# Allegro board lay-90829-A.brd
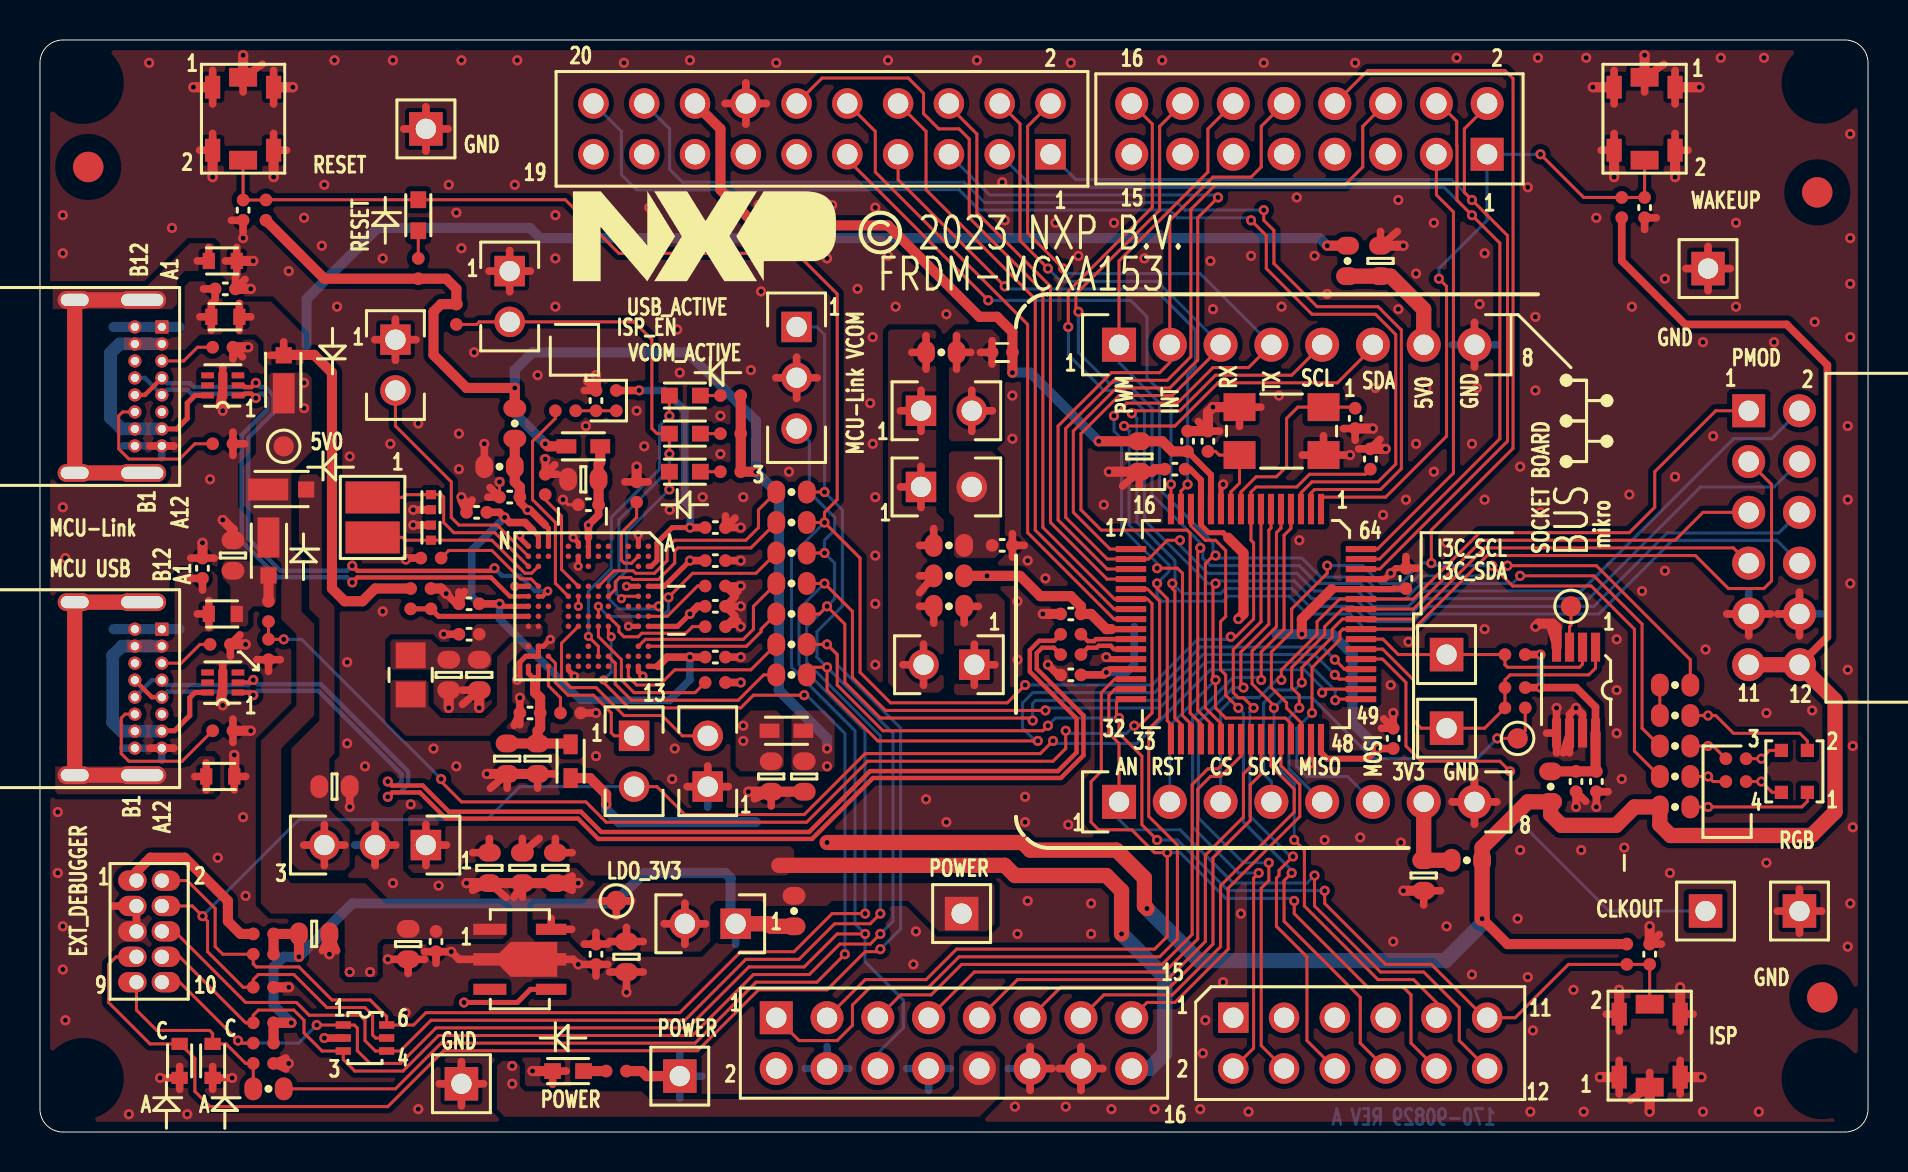
[diagram p0: board, top side]
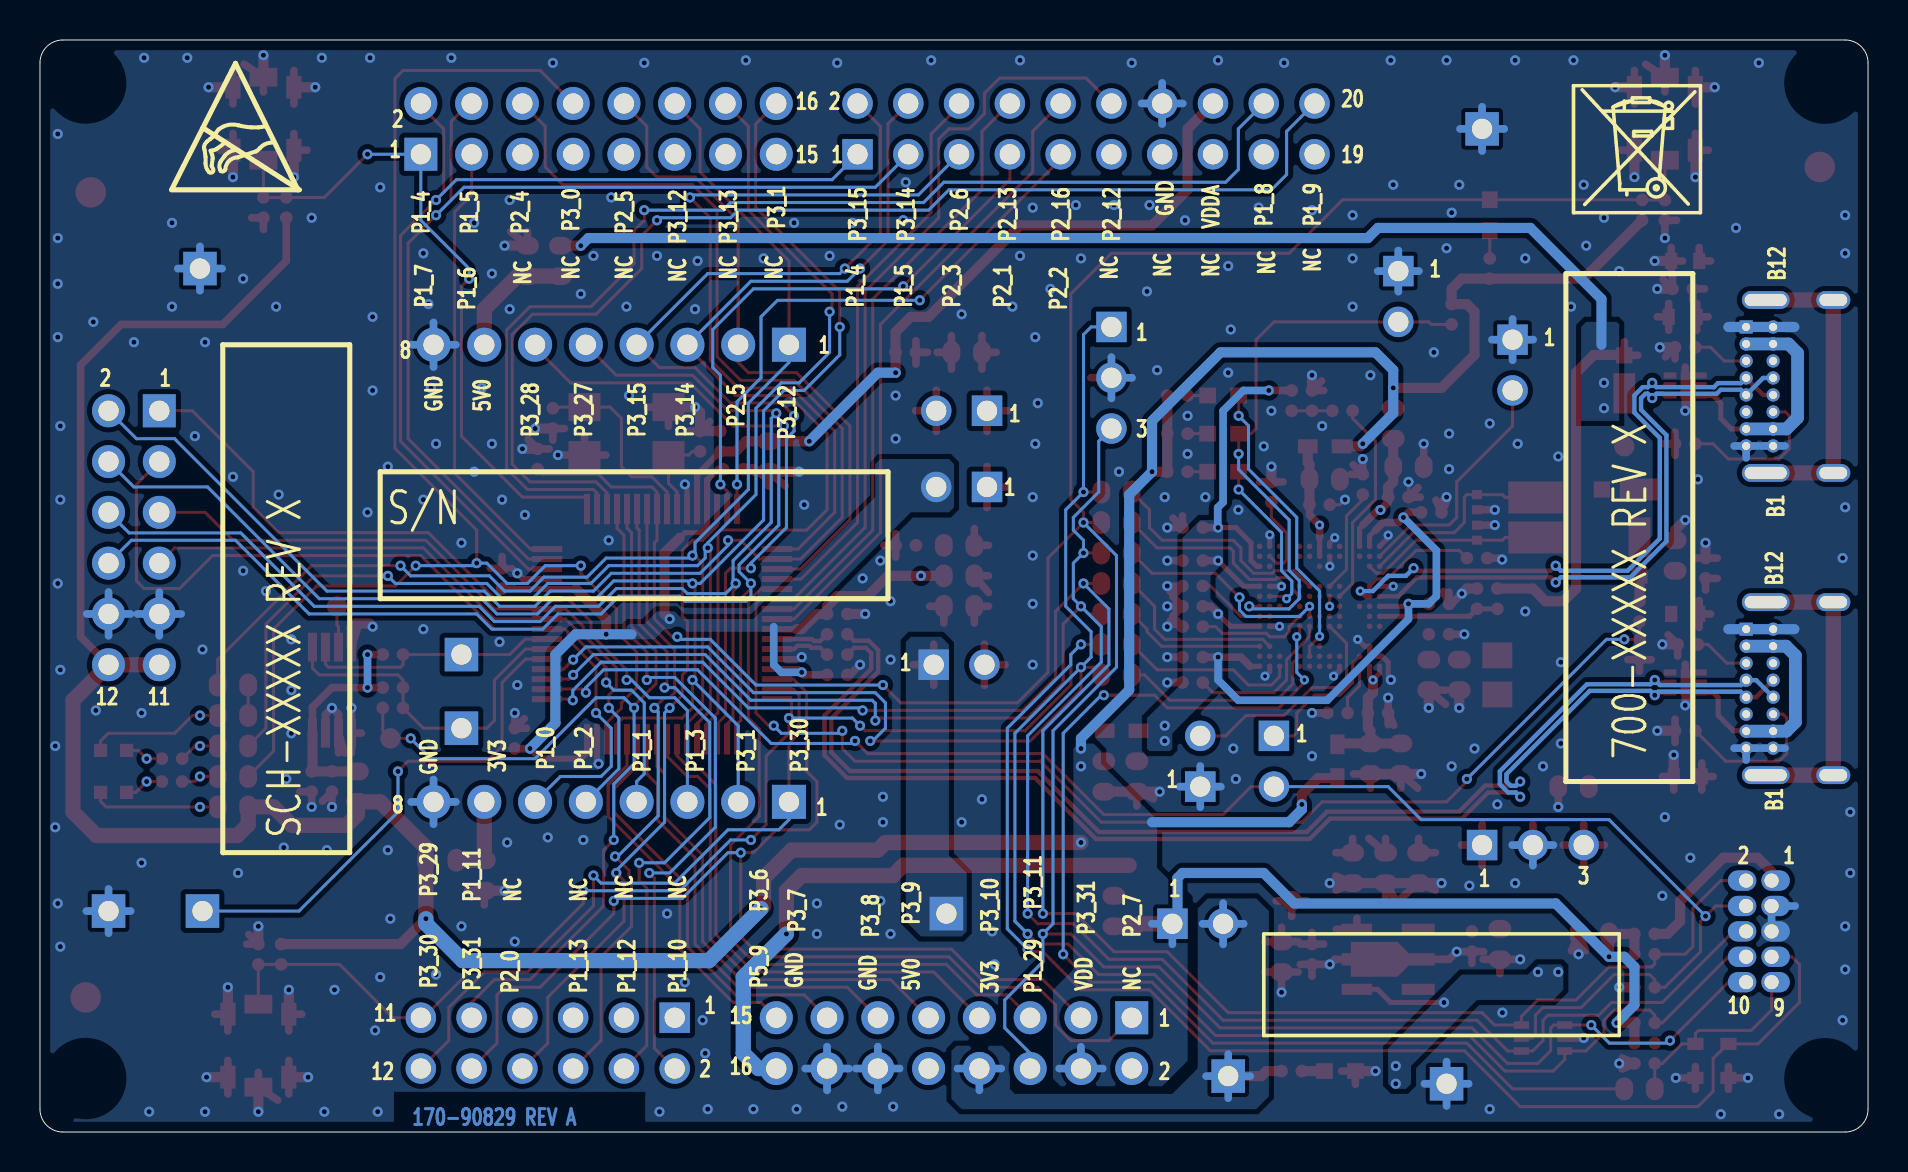
[diagram p1: board, bottom side, seen from below]

Outline 91.44 x 54.61 mm; copper layers: TOP, BOTTOM. Coordinates in mm from the lower left corner of the outline.
Outline path: 0,53.47 0,1.14 arc(0.33,0.33) 1.14,0 90.3,0 arc(91.11,0.33) 91.44,1.14 91.44,53.47 arc(91.11,54.28) 90.3,54.61 1.14,54.61 arc(0.33,54.28) 0,53.47

## Design rules (mm)
constraint set DEFAULT: min track width 0.152
net group DIFFPAIR3: nets USB0_DM USB0_DP
net group DIFFPAIR4: nets FL_USB1_DM FL_USB1_DP
net group DIFFPAIR6: nets N1600387 N1600395

## Placement (name value [footprint] x y rotation side)
BH1  125  [MH125-160]  2.16 2.67 0 top
BH2  125  [MH125-160]  89.15 52.45 0 top
BH3  125  [MH125-160]  89.15 2.67 0 top
BH4  125  [MH125-160]  2.16 52.45 0 top
C1  0.1UF  [CC0402_25]  57.4 34.54 90 top
C2  1uF  [CC0402_25]  67.69 19.69 90 top
C3  0.1UF  [CC0402_25]  51.56 22.86 180 top
C4  0.1UF  [CC0402_25]  68.33 27.69 90 top
C5  0.1UF  [CC0402_25]  56.77 33.15 180 top
C6  0.1UF  [CC0402_25]  48.13 29.34 0 top
C7  0.1UF  [CC0402_25]  51.56 25.91 180 top
C10  0.1UF  [CC0402_25]  27.81 8.89 270 top
C11  10uF  [CC0603_OV]  29.34 8.76 270 top
C12  4.7uF  [CC0603_OV]  18.41 9.4 270 top
C13  0.1UF  [CC0402_25]  19.81 9.52 270 top
C14  4.7uF  [CC0603_OV]  9.65 28.83 90 top
C15  10uF  [CC0603_OV]  38.23 17.78 270 top
C17  0.1UF  [CC0402_25]  21.84 30.99 180 top
C18  0.1UF  [CC0402_25]  33.78 30.23 0 top
C19  0.1UF  [CC0402_25]  33.78 23.75 0 top
C20  0.1UF  [CC0402_25]  33.78 28.58 0 top
C24  10uF  [CC0603_OV]  36.58 17.78 270 top
C26  0.1UF  [CC0402_25]  27.81 36.58 90 top
C27  0.1UF  [CC0402_25]  27.43 31.37 180 top
C28  47pF  [CC0603_OV]  27.18 32.64 180 top
C31  47pF  [CC0603_OV]  21.97 22.86 270 top
C32  0.1UF  [CC0402_25]  21.46 24.89 180 top
C33  22uF  [CC0603_OV]  20.45 22.86 270 top
C34  22uF  [CC0603_OV]  24.89 18.67 270 top
C35  0.1UF  [CC0402_25]  24.51 20.95 180 top
C36  47pF  [CC0603_OV]  23.37 18.67 270 top
C37  12pF  [0402_CC]  19.56 29.97 90 top
C38  12pF  [0402_CC]  19.56 31.5 270 top
C39  0.1UF  [CC0402_25]  21.46 26.42 180 top
C40  0.1UF  [CC0402_25]  33.78 26.29 0 top
C41  2.2UF  [CC0402_25]  9.27 42.16 0 top
C42  0.1UF  [CC0402_25]  23.49 31.75 180 top
C48  10uF  [CC0603_OV]  13.72 9.91 0 top
C49  18pF  [CC0402_25]  65.79 35.69 270 top
C50  1000pF  [CC0402_25]  10.16 46.1 270 top
C51  0.1UF  [CC0402_25]  66.55 33.66 90 top
C52  1000pF  [CC0402_25]  80.52 8.89 90 top
C53  18pF  [CC0402_25]  58.42 34.54 90 top
C54  1000pF  [CC0402_25]  80.26 46.23 270 top
C55  1uF  [CC0402_25]  77.85 17.53 270 top
C56  0.1UF  [CC0402_25]  76.84 17.53 270 top
C57  10uF  [CC0603_OV]  22.48 13.21 270 top
C58  10uF  [CC0603_OV]  24.13 13.21 270 top
C59  10uF  [CC0603_OV]  25.78 13.21 270 top
C60  10uF  [CC0603_OV]  14.73 17.27 0 top
C61  10uF  [CC0603_OV]  54.99 33.78 270 top
C62  10uF  [CC0603_OV]  69.22 12.83 270 top
C63  10uF  [CC0603_OV]  67.06 43.56 90 top
C64  2.2UF  [CC0402_25]  8.13 28.19 90 top
D1  MSS1P3L  [SMB_2P7X1P4]  11.43 29.08 270 top
D2  MSS1P3L  [SMB_2P7X1P4]  12.19 37.59 90 top
D3  MSS1P3L  [SMB_2P7X1P4]  12.07 32.13 0 top
D4  GREEN  [LED_0603]  26.42 3.05 180 top
D5  GREEN  [LED_0603]  32.26 36.83 180 top
D7  RED  [LED_0603]  32.26 34.93 180 top
D8  GREEN  [LED_0603]  32.26 33.02 180 top
D11  PESD3V3S1UB  [SOD523]  8.64 3.56 270 top
D12  PESD3V3S1UB  [SOD523]  6.98 3.56 270 top
D13  PESD3V3L5UY  [SOT-363_0P65_SMT]  16.26 4.7 0 top
D14  RED  [LED_0603]  18.92 45.85 90 top
D15  RGB  [LED4_2P7X2P6_SM]  87.76 18.03 90 top
J1  CON 2x8 SKT  [CON2X8_2P54_TH]  72.39 48.9 270 top
J2  HDR 2X10 TH  [HDR_2X10_2P54MM_TH]  50.55 48.9 270 top
J3  CON 2x8 SKT  [CON2X8_2P54_TH]  36.83 5.71 90 top
J4  CON 2X6  [CON_SKT2X6_100_TH]  59.69 5.71 90 top
J5  CON SKT 8  [CON_1X8_SKT_2P54_TH]  53.98 39.37 90 top
J6  CON SKT 8  [CON_1X8_SKT_2P54_TH]  53.98 16.51 90 top
J7  PPPC062LJBN-RC  [SKT2X6_100_TH_RA]  85.47 36.07 0 top
J8  USB_TYPE_C  [CON16_USB_TYPE-C_RA_TH]  6.1 25.15 270 top
J9  HDR 1X1  [HDR101]  19.3 50.16 0 top
J10  HDR 1X1  [HDR101]  88.01 11.05 0 top
J11  HDR 1X1  [HDR101]  83.44 43.18 0 top
J12  HDR 1X1  [HDR101]  21.08 2.41 270 top
J13  HDR 1X1  [HDR101]  46.1 10.92 90 top
J14  HDR 1X1  [HDR101]  32 2.79 0 top
J15  USB_TYPE_C  [CON16_USB_TYPE-C_RA_TH]  6.1 40.26 270 top
J18  HDR 2X5  [HDR_5X2_FTSH_TH]  4.83 12.57 0 top
J19  HDR 1X1  [HDR101]  83.31 11.05 180 top
J20  HDR 1X1  [HDR101]  70.36 20.19 0 top
J21  HDR 1X1  [HDR101]  70.36 23.88 0 top
J22  HDR_1X3  [HDR103]  19.3 14.35 270 top
J25  HDR_1X3  [HDR103]  37.85 40.26 0 top
JP1  HDR 1X2  [HDR102_95L]  44.07 36.07 90 top
JP2  HDR 1X2  [HDR102_95L]  44.07 32.26 90 top
JP3  HDR 1X2  [HDR102_95L]  46.74 23.37 270 top
JP6  HDR 1X2  [HDR102_95L]  34.8 10.41 270 top
JP8  HDR 1X2  [HDR102_95L]  23.49 43.05 0 top
JP10  HDR 1X2  [HDR102_95L]  29.72 19.81 0 top
JP19  HDR 1X2  [HDR102_95L]  33.4 17.27 180 top
JP20  HDR 1X2  [HDR102_95L]  17.78 39.62 0 top
L1  120 Ohm  [IND_0402]  48.13 38.99 180 top
L2  330 OHM  [IND_1608]  9.14 25.91 0 top
L3  330 OHM  [IND_1608]  9.02 17.78 0 top
L4  600OHM  [IND_1P8X1MM_SM]  37.34 20.07 180 top
L5  600OHM  [IND_1P8X1MM_SM]  27.18 34.29 0 top
L6  4.7uH  [IND_0805]  18.54 22.86 90 top
L7  600OHM  [IND_1P8X1MM_SM]  26.54 18.54 90 top
L8  330 OHM  [IND_1608]  9.27 40.77 0 top
L9  330 OHM  [IND_1608]  9.14 43.56 0 top
NOREF  -  []  22.7 6.34 0 top
NOREF#2  -  [unnamed#2]  89.15 6.73 0 top
NOREF#3  -  []  1.74 17.85 0 top
NOREF#4  -  []  89.01 13.99 0 top
NOREF#5  -  []  35.21 7.02 0 top
NOREF#6  -  []  4.75 19.2 0 top
NOREF#7  -  []  88.01 23.37 0 top
NOREF#8  -  []  66.08 21.65 90 top
NOREF#9  -  []  78.99 5.89 90 top
NOREF#10  -  []  87.11 16.98 90 top
NOREF#11  -  []  22.7 6.34 90 top
NOREF#12  -  []  25.99 47.48 90 top
NOREF#13  -  []  1.18 1.03 0 top
NOREF#14  -  []  59.69 5.71 0 top
NOREF#15  -  []  4.75 34.31 0 top
NOREF#16  -  []  26.54 17.7 90 top
NOREF#17  -  []  0 50.36 0 top
NOREF#18  -  []  77.11 55.87 0 top
NOREF#19  -  []  89.51 21.67 0 top
NOREF#20  -  []  26.28 33.79 90 top
NOREF#21  -  []  57.99 7.09 0 top
NOREF#22  -  []  6.49 26.75 90 top
NOREF#23  -  []  36.49 20.07 0 top
NOREF#24  -  []  42.04 44.96 0 top
NOREF#25  -  []  1.74 17.85 90 top
NOREF#26  -  []  26.04 16.64 90 top
NOREF#27  -  []  36.83 5.71 0 top
NOREF#28  -  []  6.49 41.86 90 top
NOREF#29  -  []  82.04 2.74 90 top
NOREF#30  -  []  6.1 39.41 90 top
NOREF#31  -  []  74.47 2.02 90 top
NOREF#32  -  []  54.61 48.9 90 top
NOREF#33  -  [unnamed#2]  2.41 48.26 0 top
NOREF#34  -  []  8.63 49.1 90 top
NOREF#35  -  []  77.11 52.97 90 top
NOREF#36  -  []  56.23 1.87 90 top
NOREF#37  -  []  74.09 1.8 90 top
NOREF#38  -  []  85.47 23.37 0 top
NOREF#39  -  []  1.74 32.96 90 top
NOREF#40  -  []  52.99 47.59 0 top
NOREF#41  -  []  25.99 47.48 0 top
NOREF#42  -  []  87.99 0 90 top
NOREF#43  -  []  22.5 7.13 0 top
NOREF#44  -  []  98.21 21.67 90 top
NOREF#45  -  []  30.23 4.83 0 top
NOREF#46  -  []  85.47 33.53 90 top
NOREF#47  -  [unnamed#2]  88.9 46.99 0 top
NOREF#48  -  []  1.74 32.96 0 top
NOREF#49  -  []  89.01 13.99 90 top
NOREF#50  -  []  74.47 4.92 0 top
NOREF#51  -  []  26.28 34.79 0 top
NOREF#52  -  []  72.39 3.17 90 top
NOREF#53  -  []  87.11 19.08 0 top
NOREF#54  -  []  26.04 17.64 0 top
NOREF#55  -  []  10.16 48.6 90 top
NOREF#56  -  []  27.69 48.9 90 top
NOREF#57  -  []  54.61 48.9 0 top
NOREF#58  -  []  38.24 17.76 90 top
NOREF#59  -  []  59.69 5.71 0 top
NOREF#60  -  []  80.26 48.6 90 top
NOREF#61  -  []  -12.34 -178.97 0 top
NOREF#62  -  []  52.99 47.59 90 top
NOREF#63  -  []  10.16 48.6 90 top
NOREF#64  -  []  26.67 42.55 0 top
NOREF#65  -  []  6.1 24.3 90 top
NOREF#66  -  []  78.74 49.1 90 top
NOREF#67  -  []  -272.82 262.61 0 top
NOREF#68  -  []  54.61 3.17 90 top
NOREF#69  -  []  27.69 48.9 0 top
NOREF#70  -  []  7.01 55.87 0 top
NOREF#71  -  []  37.24 19.57 0 top
NOREF#72  -  []  87.35 -34.82 0 top
NOREF#73  -  []  -2.66 26.75 0 top
NOREF#74  -  []  80.52 2.24 90 top
NOREF#75  -  []  22.5 10.14 0 top
NOREF#76  -  []  26.33 34.29 0 top
NOREF#77  -  []  80.26 48.6 90 top
NOREF#78  -  []  -297.46 -258.98 0 top
NOREF#79  -  []  7.01 52.97 90 top
NOREF#80  -  []  -2.66 41.86 0 top
NOREF#81  -  []  30.23 4.83 180 bottom
NOREF#82  -  []  75.95 13.97 90 bottom
NOREF#83  -  []  8.76 17.53 90 bottom
NOREF#84  -  []  74.42 26.67 180 bottom
NOREF#85  -  []  14.73 45.97 180 bottom
NOREF#86  -  []  84.84 47.12 180 bottom
R1  0  [RC0603_OV]  45.47 29.34 0 top
R2  2.7  [RC0603_OV]  45.47 26.29 180 top
R3  0  [RC0603_OV]  81.79 17.78 0 top
R4  0  [RC0603_OV]  81.79 22.35 180 top
R5  0  [RC0603_OV]  81.79 19.3 0 top
R7  33  [RC0402_25]  51.56 24.89 0 top
R8  33  [RC0402_25]  51.56 23.88 0 top
R9  10K  [RC0402_25]  11.43 26.03 270 top
R10  20K  [RC0402_25]  11.43 24.13 270 top
R12  470  [RC0402_25]  28.83 3.05 180 top
R13  10K  [RC0402_25]  28.83 36.58 270 top
R14  100  [RC0402_25]  26.29 36.07 180 top
R15  510  [RC0402_25]  34.54 36.83 180 top
R17  510  [RC0402_25]  34.54 34.93 180 top
R19  510  [RC0402_25]  34.54 33.02 180 top
R24  10K  [RC0402_25]  18.54 26.67 270 top
R26  20K  [RC0402_25]  19.56 26.67 90 top
R30  2.0K  [RC0603_OV]  23.75 35.43 270 top
R31  2.0K  [RC0603_OV]  22.99 33.27 180 top
R32  100K  [RC0402_25]  20.83 40.89 270 top
R35  1K  [RC0402_25]  26.54 20.95 0 top
R36  1K  [RC0402_25]  33.78 25.27 0 top
R37  1K  [RC0402_25]  33.78 27.3 0 top
R44  100  [RC0402_25]  11.18 9.91 180 top
R45  100K  [RC0402_25]  11.18 8.89 180 top
R46  100K  [RC0402_25]  11.18 5.46 180 top
R47  100K  [RC0402_25]  11.18 4.45 180 top
R48  2.0K  [RC0603_OV]  11.43 2.16 180 top
R49  100K  [RC0402_25]  11.18 7.24 0 top
R50  2.2K  [RC0402_25]  11.18 3.43 0 top
R51  10K  [RC0402_25]  11.3 46.1 90 top
R52  10K  [RC0402_25]  79.38 8.89 270 top
R53  470  [RC0402_25]  18.92 43.18 90 top
R55  10K  [RC0402_25]  79.12 46.23 90 top
R56  0  [RC0603_OV]  75.57 17.27 90 top
R57  680  [RC0603_OV]  81.79 20.83 180 top
R58  0  [RC0603_OV]  81.79 16.26 0 top
R59  1K  [RC0402_25]  73.79 21.21 180 top
R60  470  [RC0402_25]  84.84 18.67 180 top
R61  2.2K  [RC0402_25]  73.79 23.88 180 top
R62  2.2K  [RC0402_25]  73.79 22.23 180 top
R63  470  [RC0402_25]  84.84 17.53 180 top
R64  0  [RC0603_OV]  71.37 13.59 180 top
R65  0  [RC0603_OV]  65.41 43.56 270 top
R66  0  [RC0603_OV]  45.09 38.99 0 top
R67  0  [RC0603_OV]  45.47 27.81 0 top
R68  0  [RC0603_OV]  37.72 11.05 270 top
R69  0  [RC0603_OV]  37.59 27.43 180 top
R70  0  [RC0603_OV]  37.59 30.48 180 top
R71  0  [RC0603_OV]  37.59 28.96 180 top
R72  0  [RC0603_OV]  37.59 24.38 180 top
R73  0  [RC0603_OV]  37.59 32 180 top
R74  220  [RC0603_OV]  37.59 25.91 0 top
R75  0  [RC0603_OV]  37.59 22.86 0 top
R117  1K  [RC0402_25]  29.84 32 90 top
R118  1K  [RC0402_25]  19.56 28.7 180 top
R119  1K  [RC0402_25]  25.27 32.38 90 top
R120  1K  [RC0402_25]  33.78 22.48 0 top
R121  5.1K  [RC0402_25]  9.02 24.38 0 top
R122  5.1K  [RC0402_25]  9.14 20.07 0 top
R123  5.1K  [RC0402_25]  9.14 39.24 0 top
R124  5.1K  [RC0402_25]  9.14 34.42 0 top
SW1  PTS820 J15M SMTR LFS  [SW6_4P15_4P6X2P9]  10.16 50.67 270 top
SW2  PTS820 J15M SMTR LFS  [SW6_4P15_4P6X2P9]  80.52 4.32 90 top
SW3  PTS820 J15M SMTR LFS  [SW6_4P15_4P6X2P9]  80.26 50.67 270 top
TP1  -  [TPAD_040]  12.19 34.29 0 top
TP2  -  [TPAD_040]  28.83 11.56 0 top
TP5  -  [TPAD_040]  73.91 19.69 90 top
TP6  -  [TPAD_040]  76.58 26.29 270 top
U2  XC6227C331PR-G  [SOT89-5]  24 8.64 270 top
U3  RClamp0854P.TCT  [SLP1616P6]  9.14 22.48 90 top
U4  LPC55S69JEV98  [BGA98_0P5_7X7]  27.43 26.29 270 top
U6  RClamp0854P.TCT  [SLP1616P6]  9.14 37.34 90 top
U8  P3T1755DP  [TSSOP8_A]  76.84 22.1 270 top
U9  MCXA153VLH  [LQFP64]  60.32 25.4 270 top
Y1  8MHz  [XTAL4_5X3]  62.1 35.05 180 top
Y2  16MHz  [XTAL2_3P3X2P6]  16.64 30.73 270 top

## Library data of the parts
BH1-BH4 = MOUNT_HOLE
C1-C7 C10-C15 C17-C20 C24 C26-C28 C31-C42 C48-C64 = CAP_NP
D1-D3 = DIODE_SCHTKY
D4 D5 D7 D8 D14 = LED
D11 D12 = DIODE_TVS
D13 = DIODE_ARRAY_5CH
D15 = LRTBR48G_4P
J1 J3 = CONN_HDR_8X2
J2 = CONN_HDR_10X2
J4 J7 = CONN_HDR_6X2
J5 J6 = CONN_HDR_8X1
J8 J15 = USB16_TYPEC_4SH
J9-J14 J19-J21 = CONN_HDR_1X1
J18 = CONN_HDR_5X2
J22 J25 = CONN_HDR_3X1
JP1-JP3 JP6 JP8 JP10 JP19 JP20 = CONN_HDR_2X1
L1 = INDUCTOR_FERRITE
L2 L3 L8 L9 = BEAD
L4-L7 = INDUCTOR
R1-R5 R7-R10 R13-R15 R17 R19 R24 R26 R30-R32 R35-R37 R44-R52 R55-R59 R61 R62 R64-R75 R117-R124 = RES
R12 R53 R60 R63 = RES: tolerance: 1%
SW1-SW3 = PTS820J20MSMTRLFS_6P
TP1 TP2 TP5 TP6 = TestLoop
U2 = XC6227C_5P
U3 U6 = RCLAMP1654P_NEW
U4 = NIOBE4_MINI_FBGA98
U8 = P3T2175DP_TSSOP8
U9 = NIRVANA_MCXA10_LQFP64_A
Y1 = XTAL_13
Y2 = XTAL

## Footprints (pads in the part's own frame, mm; a bottom-side part is the same pattern mirrored in y, then rotated)
0402_CC
  rect 0.457x0.508 smd: 1(-0.376,0) 2(0.376,0)
BGA98_0P5_7X7
  round 0.279 smd: A1(-3,3) A2(-2.499,3) A3(-1.999,3) A5(-1.001,3) A6(-0.5,3) A7(0,3) A8(0.5,3) A9(1.001,3) A11(1.999,3) A12(2.499,3) A13(3,3) B1(-3,2.499) B2(-2.499,2.499) B3(-1.999,2.499) B5(-1.001,2.499) B6(-0.5,2.499) B7(0,2.499) B8(0.5,2.499) B9(1.001,2.499) B11(1.999,2.499) B12(2.499,2.499) B13(3,2.499) C1(-3,1.999) C2(-2.499,1.999) C7(0,1.999) C12(2.499,1.999) C13(3,1.999) E1(-3,1.001) E2(-2.499,1.001) E5(-1.001,1.001) E6(-0.5,1.001) E7(0,1.001) E8(0.5,1.001) E9(1.001,1.001) E12(2.499,1.001) E13(3,1.001) F1(-3,0.5) F2(-2.499,0.5) F5(-1.001,0.5) F6(-0.5,0.5) F8(0.5,0.5) F9(1.001,0.5) F12(2.499,0.5) F13(3,0.5) G1(-3,0) G2(-2.499,0) G3(-1.999,0) G5(-1.001,0) G6(-0.5,0) G8(0.5,0) G9(1.001,0) G11(1.999,0) G12(2.499,0) G13(3,0) H1(-3,-0.5) H2(-2.499,-0.5) H5(-1.001,-0.5) H6(-0.5,-0.5) H8(0.5,-0.5) H9(1.001,-0.5) H12(2.499,-0.5) H13(3,-0.5) J1(-3,-1.001) J2(-2.499,-1.001) J5(-1.001,-1.001) J6(-0.5,-1.001) J7(0,-1.001) J8(0.5,-1.001) J9(1.001,-1.001) J12(2.499,-1.001) J13(3,-1.001) L1(-3,-1.999) L2(-2.499,-1.999) L7(0,-1.999) L12(2.499,-1.999) L13(3,-1.999) M1(-3,-2.499) M2(-2.499,-2.499) M3(-1.999,-2.499) M5(-1.001,-2.499) M6(-0.5,-2.499) M7(0,-2.499) M8(0.5,-2.499) M9(1.001,-2.499) M11(1.999,-2.499) M12(2.499,-2.499) M13(3,-2.499) N1(-3,-3) N2(-2.499,-3) N3(-1.999,-3) N5(-1.001,-3) N6(-0.5,-3) N7(0,-3) N8(0.5,-3) N9(1.001,-3) N11(1.999,-3) N12(2.499,-3) N13(3,-3)
CC0402_25
  round 0.635 smd: 1(-0.508,0) 2(0.508,0)
CC0603_OV
  oval 0.889x1.143 smd: 1(-0.762,0) 2(0.762,0)
CON2X8_2P54_TH
  rect 1.651x1.651 hole 1.016: 1(0,0)
  round 1.651 hole 1.016: 2(-2.54,0) 3(0,-2.54) 4(-2.54,-2.54) 5(0,-5.08) 6(-2.54,-5.08) 7(0,-7.62) 8(-2.54,-7.62) 9(0,-10.16) 10(-2.54,-10.16) 11(0,-12.7) 12(-2.54,-12.7) 13(0,-15.24) 14(-2.54,-15.24) 15(0,-17.78) 16(-2.54,-17.78)
CON16_USB_TYPE-C_RA_TH
  rect 0.66x0.66 hole 0.406: A1(0,0)
  round 0.66 hole 0.406: A4(0.85,0) A5(1.7,0) A6(2.55,0) A7(3.4,0) A8(4.25,0) A9(5.1,0) A12(5.95,0) B1(5.95,-1.35) B4(5.1,-1.35) B5(4.25,-1.35) B6(3.4,-1.35) B7(2.55,-1.35) B8(1.7,-1.35) B9(0.85,-1.35) B12(0,-1.35)
  oval 0.889x2.388 hole 0.61x2.108: SH1(-1.35,-0.98) SH2(7.3,-0.98)
  oval 0.889x1.702 hole 0.61x1.397: SH3(-1.35,-4.36) SH4(7.3,-4.36)
CON_1X8_SKT_2P54_TH
  rect 1.702x1.702 hole 1.016: 1(0,0)
  round 1.702 hole 1.016: 2(0,-2.54) 3(0,-5.08) 4(0,-7.62) 5(0,-10.16) 6(0,-12.7) 7(0,-15.24) 8(0,-17.78)
CON_SKT2X6_100_TH
  rect 1.524x1.524 hole 1.016: 1(0,0)
  round 1.524 hole 1.016: 2(-2.54,0) 3(0,-2.54) 4(-2.54,-2.54) 5(0,-5.08) 6(-2.54,-5.08) 7(0,-7.62) 8(-2.54,-7.62) 9(0,-10.16) 10(-2.54,-10.16) 11(0,-12.7) 12(-2.54,-12.7)
HDR101
  rect 1.676x1.676 hole 1.016: 1(0,0)
HDR102_95L
  rect 1.524x1.524 hole 1.016: 1(0,0)
  round 1.524 hole 1.016: 2(0,-2.54)
HDR103
  rect 1.524x1.524 hole 1.016: 1(0,0)
  round 1.524 hole 1.016: 2(0,-2.54) 3(0,-5.08)
HDR_2X10_2P54MM_TH
  rect 1.524x1.524 hole 1.016: 1(0,0)
  round 1.524 hole 1.016: 2(-2.54,0) 3(0,-2.54) 4(-2.54,-2.54) 5(0,-5.08) 6(-2.54,-5.08) 7(0,-7.62) 8(-2.54,-7.62) 9(0,-10.16) 10(-2.54,-10.16) 11(0,-12.7) 12(-2.54,-12.7) 13(0,-15.24) 14(-2.54,-15.24) 15(0,-17.78) 16(-2.54,-17.78) 17(0,-20.32) 18(-2.54,-20.32) 19(0,-22.86) 20(-2.54,-22.86)
HDR_5X2_FTSH_TH
  oval 1.422x1.016 hole 0.711: 1(0,0) 2(1.27,0) 3(0,-1.27) 4(1.27,-1.27) 5(0,-2.54) 6(1.27,-2.54) 7(0,-3.81) 8(1.27,-3.81) 9(0,-5.08) 10(1.27,-5.08)
IND_1P8X1MM_SM
  rect 0.991x0.711 smd: 1(-0.846,0) 2(0.846,0)
IND_0402
  round 0.635 smd: 1(-0.508,0) 2(0.508,0)
IND_0805
  rect 1.295x1.499 smd: 1(-0.978,0) 2(0.978,0)
IND_1608
  rect 0.61x0.813 smd: 1(-0.701,0) 2(0.701,0)
LED4_2P7X2P6_SM
  rect 0.66x0.66 smd: 1(-1.049,-0.65) 2(1.049,-0.65) 3(1.049,0.65) 4(-1.049,0.65)
LED_0603
  rect 0.838x0.787 smd: A(-0.775,0) C(0.775,0)
LQFP64
  rect 1.524x0.305 smd: 1(-5.753,3.753) 2(-5.753,3.252) 3(-5.753,2.752) 4(-5.753,2.252) 5(-5.753,1.751) 6(-5.753,1.251) 7(-5.753,0.751) 8(-5.753,0.25) 9(-5.753,-0.25) 10(-5.753,-0.751) 11(-5.753,-1.251) 12(-5.753,-1.751) 13(-5.753,-2.252) 14(-5.753,-2.752) 15(-5.753,-3.252) 16(-5.753,-3.753) 33(5.753,-3.753) 34(5.753,-3.252) 35(5.753,-2.752) 36(5.753,-2.252) 37(5.753,-1.751) 38(5.753,-1.251) 39(5.753,-0.751) 40(5.753,-0.25) 41(5.753,0.25) 42(5.753,0.751) 43(5.753,1.251) 44(5.753,1.751) 45(5.753,2.252) 46(5.753,2.752) 47(5.753,3.252) 48(5.753,3.753)
  rect 0.305x1.524 smd: 17(-3.753,-5.753) 18(-3.252,-5.753) 19(-2.752,-5.753) 20(-2.252,-5.753) 21(-1.751,-5.753) 22(-1.251,-5.753) 23(-0.751,-5.753) 24(-0.25,-5.753) 25(0.25,-5.753) 26(0.751,-5.753) 27(1.251,-5.753) 28(1.751,-5.753) 29(2.252,-5.753) 30(2.752,-5.753) 31(3.252,-5.753) 32(3.753,-5.753) 49(3.753,5.753) 50(3.252,5.753) 51(2.752,5.753) 52(2.252,5.753) 53(1.751,5.753) 54(1.251,5.753) 55(0.751,5.753) 56(0.25,5.753) 57(-0.25,5.753) 58(-0.751,5.753) 59(-1.251,5.753) 60(-1.751,5.753) 61(-2.252,5.753) 62(-2.752,5.753) 63(-3.252,5.753) 64(-3.753,5.753)
MH125-160
  round 0 hole 3.175 unplated: (0,0)
RC0402_25
  round 0.635 smd: 1(-0.508,0) 2(0.508,0)
RC0603_OV
  oval 0.889x1.143 smd: 1(-0.762,0) 2(0.762,0)
SKT2X6_100_TH_RA
  rect 1.651x1.651 hole 1.016: 1(0,0)
  round 1.651 hole 1.016: 2(2.54,0) 3(0,-2.54) 4(2.54,-2.54) 5(0,-5.08) 6(2.54,-5.08) 7(0,-7.62) 8(2.54,-7.62) 9(0,-10.16) 10(2.54,-10.16) 11(0,-12.7) 12(2.54,-12.7)
SLP1616P6
  rect 0.305x0.635 smd: 1(-0.5,-0.759) 2(0,-0.759) 3(0.5,-0.759) 4(0.5,0.759) 5(0,0.759) 6(-0.5,0.759)
  rect 1.295x0.457 smd: 7(0,0)
SMB_2P7X1P4
  rect 0.813x0.813 smd: A(1.25,0)
  rect 2.007x1.092 smd: C(-0.65,0)
SOD523
  rect 0.61x0.813 smd: A(0.851,0) C(-0.851,0)
SOT89-5
  rect 0.559x1.651 smd: 1(-1.501,-1.501) 3(1.501,-1.501)
  custom 1.748x4.648 smd: 2(0,0)
  rect 0.559x1.524 smd: 4(1.501,1.565) 5(-1.501,1.565)
SOT-363_0P65_SMT
  rect 0.762x0.381 smd: 1(-1.085,0.65) 2(-1.085,0) 3(-1.085,-0.65) 4(1.085,-0.65) 5(1.085,0) 6(1.085,0.65)
SW6_4P15_4P6X2P9
  rect 0.94x1.397 smd: 1(-2.075,0) 2(2.075,0)
  rect 1.143x0.762 smd: 3(-1.575,1.525) 4(1.575,1.525) 5(-1.575,-1.525) 6(1.575,-1.525)
TPAD_040
  round 1.016 smd: 1(0,0)
TSSOP8_A
  rect 1.448x0.457 smd: 1(-2.149,0.975) 2(-2.149,0.325) 3(-2.149,-0.325) 4(-2.149,-0.975) 5(2.149,-0.975) 6(2.149,-0.325) 7(2.149,0.325) 8(2.149,0.975)
unnamed#2
  round 1.524 smd: (0,0)
XTAL2_3P3X2P6
  rect 1.6x2.718 smd: 1(-1.001,0) 2(1.001,0)
XTAL4_5X3
  rect 1.6x1.397 smd: 1(-2.101,-1.199) 2(2.101,-1.199) 3(2.101,1.199) 4(-2.101,1.199)

## Nets
GND: C1.2 C2.2 C3.2 C4.2 C5.2 C6.2 C7.2 C10.2 C11.2 C12.2 C13.2 C14.2 C15.2 C17.2 C18.2 C19.2 C20.2 C24.2 C26.2 C27.2 C28.2 C31.2 C32.2 C33.2 C34.2 C35.2 C36.2 C37.2 C38.2 C39.2 C40.2 C41.2 C42.2 C48.2 C49.2 C50.2 C51.2 C52.2 C53.2 C54.2 C55.2 C56.2 C57.2 C58.2 C59.2 C60.2 C61.2 C62.2 C63.2 C64.2 D4.C(CATHODE) D11.A D12.A D13.2 J2.14 J3.12 J3.14 J5.8 J6.8 J7.9 J7.10 J8.A1 J8.A12 J8.B1 J8.B12 J9.1 J10.1 J11.1 J12.1 J15.A1 J15.A12 J15.B1 J15.B12 J18.3 J18.5 J22.2 J25.2 JP8.1 JP19.1 JP20.1 L3.2 L9.2 R10.2 R26.2 R31.2 R35.2 R36.2 R37.2 R49.2 R50.2 R117.2 R118.2 R119.2 R120.2 R121.2 R122.2 R123.2 R124.2 SW1.1 SW1.3 SW1.4 SW1.5 SW1.6 SW2.1 SW2.3 SW2.4 SW2.5 SW2.6 SW3.1 SW3.3 SW3.4 SW3.5 SW3.6 U2.2(VSS) U3.7 U4.B1 U4.B5 U4.B9 U4.B13 U4.H1 U4.H2 U4.J13 U4.M11 U4.M12 U4.N1 U4.N5 U4.N12 U6.7 U8.4 U8.5 U8.6 U8.7 U9.11 U9.28 U9.47 U9.61(VSS4) Y1.2 Y1.4
P5V_HDR_IN: C60.1 D3.A J22.3
P5V_MCU_LINK_USB: D2.A L8.2 R24.1
P5V_USB_FS: C14.1 D1.A L2.2 R9.1
VBAT_DCDC/VBAT_PMU: C34.1 C35.1 C36.1 L7.2 U4.M13 U4.N13
VDD_BOARD: C15.1 C48.1 J3.4 J7.11 J7.12(B6) JP6.1 L4.1 L5.1 L7.1 R15.1 R17.1 R19.1 R30.1 R32.1 R44.1 R45.1 R46.1 R47.1 R51.1 R52.1 R53.1 R55.1 R56.1 R58.1 R64.1 R68.2
VDD_MCU: C2.1 C3.1 C4.1 C5.1 C6.1 JP2.2 R1.2 U9.13 U9.29 U9.48 U9.60
VDD_P3T: C55.1 C56.1 R56.2 R61.1 R62.1 U8.8(VCC)
VDD_USB: C7.1 R67.2 U9.25
VDDA_MCU: C1.1 C61.1 J2.16 L1.1 U9.12
DBGIF_DETECT: R48.1 U4.E9
DBGIF_ISP0_CTRL: R72.2 U4.C13
DBGIF_RESET: R70.2 U4.E6
DBGIF_TCK_SWCLK: JP10.1 U4.L12
DBGIF_TDI: R73.2 U4.F5
DBGIF_TDO_SWO: R71.2 U4.F8
DBGIF_TMS_SWDIO: R69.2 U4.B11
DBGIF_VREF: C42.1 R30.2 R31.1 U4.L1
FL_USB1_DM: J15.A7 J15.B7 U4.N6 U6.1
FL_USB1_DP: J15.A6 J15.B6 U4.M6 U6.2
HW_VER_0: R36.1 U4.E8
HW_VER_1: R37.1 U4.A8
HW_VER_2: R120.1 U4.F9
HW_VER_3: R117.1 U4.B2
HW_VER_4: R118.1 U4.M5
HW_VER_5: R119.1 U4.H5
HW_VER_6: JP19.2 U4.H9
HW_VER_7: JP20.2 U4.N2
HW_VER_8: R35.1 U4.L13
JTAG_VREF: J18.1 R44.2
LDO_3V3: C10.1 C11.1 J3.8 J13.1 J14.1 JP3.1 JP6.2 R2.1 R12.1 R68.1 TP2.1(PIN1) U2.5
LED_USB_COMM: D5.C(CATHODE) U4.F12
LED_VCOM_ACT: D8.C(CATHODE) U4.B6
MCU_LINK_3V3: C17.1 C18.1 C19.1 C20.1 C24.1 C39.1 C40.1 L4.2 R13.1 U4.A3 U4.A5 U4.A9 U4.A13 U4.M1 U4.N7
MCU_LINK_N_16MHZ: C37.1 U4.M3 Y2.2
MCU_LINK_P_16MHZ: C38.1 U4.N3 Y2.1
MCU_LINK_RST: R14.2 U4.J6
MCU_LNK_RX: R75.1 U4.E12
MCU_LNK_TX: R74.1 U4.A11
MCU_VDD_P3V3: JP1.1 JP2.1 JP3.2 R1.1 R2.2 R66.1 R67.1
P0_0/SWDIO: D13.6(K5) J18.2 R45.2 R69.1 U9.49
P0_1/SWCLK: D13.5 J18.4 JP10.2 R49.1 U9.50
P0_2: D13.4 J18.6 J25.3 R71.1 R74.2 U9.51
P0_3: D13.3 J18.8 J25.1 R46.2 R73.1 R75.2 U9.52
P0_6/CLKOUT: J19.1 U9.53
P0_16/I3C0_SDA-P3T: J20.1 R59.2 R62.2 U8.1 U9.54
P0_17/I3C0_SCL-P3T: J21.1 R61.2 U8.2 U9.55
P1_0: J6.6 J7.3 U9.56
P1_1: J6.4 J7.7 U9.57
P1_2: J6.5 J7.5 U9.58
P1_3: J6.3 J7.1 U9.59
P1_4: J1.2 J2.1 U9.62
P1_5: J1.4 J2.3 U9.63
P1_6/TRIG_IN2-MC_ENC_I: J1.3 U9.64
P1_7: C54.1 J1.1 R55.2 SW3.2 U9.1
P1_8/LPI2C0_SDA-ARD_D18: J2.18 U9.2
P1_9/LPI2C0_SCL-ARD_D19: J2.20 U9.3
P1_10/ADC0_A8-ARD_A0: J4.2 U9.4
P1_11: J4.9 R59.1 TP5.1(PIN1) U9.5
P1_12/ADC0_A10-ARD_A1: J4.4 U9.6
P1_13/ADC0_A11-ARD_A2: J4.6 U9.7
P1_29/MCU_RESET_B: C50.1 C51.1 D13.1 D14.C(CATHODE) J3.6 J18.10(B5) R47.2 R51.2 R70.1 SW1.2 U9.8
P1_30/XTAL48M: C49.1 U9.9 Y1.1
P1_31/EXTAL48M: C53.1 U9.10 Y1.3
P2_0/ADC0_A0-ARD_A3: J4.8 U9.14
P2_1/ADC0_A1-MC_VOLT_DCB: J2.7 U9.15
P2_2/ADC0_A4-MC_CURRENT_DCB: J2.9 U9.16
P2_3/ADC0_A2-MC_BEMF_C: J2.5 U9.17
P2_4: J1.6 J7.2 U9.18
P2_5: J1.10 J5.2 U9.19
P2_6/LPSPI1_PCS1-ARD_D10: J2.6 U9.20
P2_7/TRIG_IN5-MC_ENC_B: J3.1 U9.21
P2_12: J2.12 R9.2 R10.1 U9.22
P2_13/LPSPI1_SDO-ARD_D11: J2.8 U9.23
P2_16/LPSPI1_SDI-ARD_D12: J2.10 U9.24
P3_0: J1.8 R3.1 U9.46
P3_0/PWM0_A0-BLED: R3.2 R63.2
P3_1: J1.16(B8) J6.2 J7.4 U9.45
P3_6/PWM0_A0-MC_PWM_AT: J3.15 U9.44
P3_7/PWM0_B0-MC_PWM_AB: J3.13 U9.43
P3_8/PWM0_A1-MC_PWM_BT: J3.11 U9.42
P3_9/PWM0_B1-MC_PWM_BB: J3.9 U9.41
P3_10/PWM0_A2-MC_PWM_CT: J3.7 U9.40
P3_11/PWM0_B2-MC_PWM_CB: J3.5 U9.39
P3_12: J1.12 J5.1 R4.1 U9.38
P3_12/PWM0_X0-RLED: R4.2 R57.2
P3_13: J1.14 R5.1 U9.37
P3_13/PWM0_X1-GLED: R5.2 R60.2
P3_14: J2.4 J5.3 U9.36
P3_15: J2.2 J5.4 U9.35
P3_27: J5.5 J7.6 U9.34
P3_28: J5.6 J7.8 U9.33
P3_29: C52.1 D12.C J4.11 J18.7 R52.2 R72.1 SW2.2 U9.32
P3_30: J4.12(B6) J6.1 U9.31
P3_31: J3.3 J4.10 U9.30
P5-9V_VIN: C57.1 C58.1 C59.1 J3.16(B8) J22.1
PIO0_5-ISP_EN-LED_SWD_ACT: D7.C(CATHODE) JP8.2 R32.2 U4.A7
SYS_5V0: C12.1 C13.1 D1.C D2.C D3.C J3.10 R65.1 TP1.1(PIN1) U2.1 U2.4
USB0_DM: R7.2 U9.26
USB0_DP: R8.2 U9.27
VREF_MCULINK: C27.1 C28.1 L5.2 U4.G1 U4.G2
N84836: C26.1 R13.2 R14.1
N85250: D5.A R15.2
N85474: D7.A R17.2
N85648: C31.1 C32.1 C33.1 L6.2 U4.M9 U4.N9
N85680: D8.A R19.2
N85830: L6.1 U4.N11
N87448: R24.2 R26.1 U4.N8
N112823: D4.A R12.2
N301213: D11.C J18.9 R48.2 R50.1
N383974: D15.3 R60.1
N384008: D15.4(CATHODE3) R63.1
N384038: D15.2 R57.1
N479793: D15.1 R58.2
N629677: D14.A R53.2
N1221514: TP6.1(PIN1) U8.3
N1403888: JP1.2 L1.2 R66.2
N1410072: C62.1 J6.7 R64.2
N1410080: C63.1 J5.7 R65.2
N1590729: C41.1 J15.A4 J15.A9 J15.B4(VBUS4) J15.B9 L8.1 U6.6(VBUS)
N1590769: J15.A5 R123.1
N1590873: J15.B5 R124.1
N1591027: J15.SH1 J15.SH2 J15.SH3 J15.SH4 L9.1
N1600329: C64.1 J8.A4 J8.A9 J8.B4(VBUS4) J8.B9 L2.1 U3.6(VBUS)
N1600369: J8.A5 R121.1
N1600387: J8.A6 J8.B6 R8.1 U3.2
N1600395: J8.A7 J8.B7 R7.1 U3.1
N1600473: J8.B5 R122.1
N1600627: J8.SH1 J8.SH2 J8.SH3 J8.SH4 L3.1

Pads without a net: J1 5 7 9 11 13 15; J2 11 13 15 17 19; J3 2; J4 1 3 5 7; J8 A8 B8; J15 A8 B8; U2 3; U3 3 4 5; U4 A1 A2 A6 A12 B3 B7 B8 B12 C1 C2 C7 C12 E1 E2 E5 E7 E13 F1 F2 F6 F13 G3 G5 G6 G8 G9 G11 G12 G13 H6 H8 H12 H13 J1 J2 J5 J7 J8 J9 J12 L2 L7 M2 M7 M8; U6 3 4 5

## Via types
v1: diameter 0.457, hole 0.203, TOP to BOTTOM, 19 vias
v2: diameter 0.508, hole 0.254, TOP to BOTTOM, 450 vias

## Routing (per net, layer and track width the routed paths; a pad name or vN(x,y) marks a point on that pad's centre or on a via; arc(x,y) is an arc through that point)
GND: length 366.7
  TOP w0.152: C27.2 26.42,31.37 v2(26.16,31.62) ; v2(22.99,32.51) C42.2 ; R36.2 v2(35.05,25.27)
  TOP w0.254: v2(23.87,22.61) 24,22.75 24,23.49 24.3,23.79 U4.N12 U4.M12 U4.M11 25.18,24.29 v1(25.53,24.64) ; U4.H1 26.93,29.46 v1(26.67,29.72) ; U4.B1 29.93,29.86 v1(29.93,29.86) ; v1(26.92,28.29) 26.92,28.3 26.92,28.78 U4.H2 ; U4.J13 26.43,23.1 v1(26.73,22.8) ; U4.N1 24,29.72 v1(24,29.84) ; U9.11 59.07,31.15 59.07,32.28 v2(59.18,32.38) ; U4.B13 29.93,23.03 v1(30.16,22.8) ; v1(29.44,25.29) U4.B9 ; v1(29.34,27.29) U4.B5 ; U4.N5 v1(23.75,27.29)
  TOP w0.305: U9.28 53.44,23.65 v2(53.34,23.75) ; 68.33,28.19 67.82,28.19 v2(67.56,27.94) 67.27,27.65 U9.61 ; U9.47 63.58,19.65 63.58,18.49 v2(63.5,18.41)
  TOP w0.381: 36.58,16.31 C24.2 35.74,16.66 ; 19.98,2.41 J12.1 ; J12.1 21.08,1.31 ; J12.1 21.08,3.52 ; J12.1 22.19,2.41 ; R37.2 34.91,27.03 ; R37.2 v2(35.05,27.3) ; R37.2 34.77,26.83 ; 8.63,51.41 SW1.5 8.63,53.09 ; JP8.1 24.52,43.05 ; JP8.1 22.47,43.05 ; JP8.1 23.49,42.02 ; JP8.1 23.49,44.08 ; 65.2,35.18 C49.2 65.79,34.59 ; 82.33,43.18 J11.1 ; J11.1 83.44,44.29 ; J11.1 83.44,42.07 ; J11.1 84.54,43.18 ; 71.76,16.51 72.87,16.51 ; 71.76,16.51 71.76,17.63 ; 71.76,16.51 70.64,16.51 ; 71.76,16.51 71.76,15.39 ; 6.69,19.2 5.5,19.2 ; C10.2 28.4,8.38 ; C10.2 27.81,7.8 ; C10.2 v2(26.92,8.38) 26.67,8.64 U2.2 20.95,8.64 v2(20.57,9.02) C13.2 ; J22.2 17.79,14.35 ; J22.2 16.76,15.38 ; J22.2 16.76,13.32 ; 18.2,50.16 J9.1 ; J9.1 19.3,49.06 ; J9.1 19.3,51.27 ; J9.1 20.41,50.16 ; 36.82,37.72 J25.2 ; J25.2 37.85,38.75 ; J25.2 37.85,36.69 ; J25.2 38.88,37.72 ; 78.99,5.05 SW2.4 78.34,5.89 ; U3.7 v2(9.14,21.34) ; U3.7 9.14,23.39 ; U3.7 8.98,21.56 ; 34.28,51.44 J2.14 ; J2.14 36.34,51.44 ; J2.14 35.31,50.41 ; J2.14 35.31,52.46 ; 54.99,32.31 C61.2 54.15,32.31 ; 7.99,49.1 SW1.6 8.63,49.94 ; 78.74,53.09 SW3.5 78.74,51.41 ; 48.64,28.75 C6.2 ; C6.2 48.64,29.92 ; C6.2 49.23,29.34 ; 25.64,2.39 25.64,3.05 26.33,3.05 ; Y1.4 65.27,33.85 ; Y1.4 63.14,33.85 ; Y1.4 64.2,34.82 ; 34.77,25.75 R36.2 34.91,25.55 ; 10.16,45.01 C50.2 9.58,45.59 ; 11.13,53.4 SW1.1 10.16,52.01 ; v2(14.22,4.7) D13.2 ; L9.2 9.85,44.23 ; L9.2 9.85,42.89 ; L9.2 9.27,43.56 ; v2(18.67,30.35) 18.67,30.35 C37.2 ; C39.2 21.23,27.03 ; C39.2 20.83,26.42 v2(20.32,26.92) ; C39.2 20.95,27 ; C18.2 34.29,30.81 ; C18.2 v2(35.05,30.23) ; C18.2 34.77,30.7 ; C19.2 v2(35.05,23.75) ; JP20.1 18.81,39.62 ; JP20.1 17.78,40.65 ; JP20.1 17.78,38.59 ; JP20.1 16.75,39.62 ; 78.99,1.9 SW2.3 78.99,3.58 ; 75.36,19.95 U8.5 ; U8.5 75.86,18.96 ; U8.5 v2(75.86,21.21) ; 5.5,34.31 6.69,34.31 ; 82.69,5.89 SW2.6 82.04,5.05 ; 9.65,19.48 R122.2 9.65,20.65 ; 10.85,23.62 R10.2 ; R10.2 12.01,23.62 ; R10.2 11.43,23.04 ; 86.92,25.91 88.01,25.91 ; 88.01,25.91 88.01,24.82 ; 88.01,25.91 88.01,27 ; 51.05,22.86 50.93,22.86 v2(50.42,23.37) ; C12.2 19.25,8.64 ; C12.2 18.41,7.92 ; C12.2 v2(17.4,8.64) ; 30.43,32.51 R117.2 29.26,32.51 ; 6.98,2.13 D12.A ; D12.A v2(6.01,2.71) ; D12.A 6.98,3.28 ; 61.07,36.25 Y1.2 60,35.29 ; 9.72,17.11 L3.2 10.29,17.78 ; 70.05,12.06 C62.2 69.22,11.35 ; R119.2 25.75,33.37 ; R119.2 v2(25.27,33.66) ; R119.2 25.86,32.89 ; 77.85,16.43 C55.2 78.44,17.02 ; 78.09,49.1 SW3.6 78.74,49.94 ; v2(21.08,31.75) 21.34,31.5 C17.2 ; 24.13,11.73 C58.2 23.71,11.73 ; 7.54,28.7 C64.2 8.71,28.7 ; 21.64,12.09 C57.2 23.32,11.73 ; 22.51,32.23 C42.2 22.4,31.75 ; 24.89,17.2 C34.2 25.73,17.91 ; 67.21,20.67 C2.2 ; C2.2 v2(67.69,20.95) ; C2.2 67.11,20.19 ; 82.44,49.1 SW3.4 81.79,49.94 ; 49.53,2.08 49.53,3.17 ; 49.53,3.17 49.53,4.27 ; 49.53,3.17 50.62,3.17 ; 68.91,28.19 68.33,28.19 68.33,28.78 ; 9.65,38.66 R123.2 10.13,38.77 ; 81.79,53.09 SW3.3 81.79,51.41 ; 81.1,9.4 C52.2 81,9.88 ; 80.26,52.01 SW3.1 81.23,53.4 ; 19.81,8.43 C13.2 ; C13.2 19.23,9.02 ; 11.69,51.41 SW1.3 11.69,53.09 ; J10.1 88.01,12.15 ; J10.1 86.91,11.05 ; J10.1 89.12,11.05 ; J10.1 88.01,9.94 ; 9.65,33.83 R124.2 ; R124.2 9.65,35 ; R124.2 10.24,34.42 ; 80.85,45.72 C54.2 80.26,45.14 ; 23.37,17.2 C36.2 22.53,17.2 ; 59,35.05 C53.2 57.94,35.53 ; 21.06,31.6 C17.2 ; C17.2 21.61,31.6 ; D11.A 8.64,3.28 ; D11.A v2(9.61,2.71) ; D11.A 8.64,2.13 ; 21.13,22.1 C31.2 21.13,21.39 ; 28.5,8 C11.2 ; C11.2 v2(29.34,6.98) ; C11.2 30.18,8 ; C20.2 v2(35.05,28.58) ; C40.2 34.77,26.77 ; C40.2 34.77,25.81 ; C40.2 v2(35.05,26.29) ; 76.2,18.96 U8.6 ; U8.6 76.51,18.96 ; U8.6 76.51,20.88 v2(76.84,21.21) 77.16,20.88 U8.7 ; 9.78,42.75 C41.2 10.26,42.64 ; R50.2 12.3,3.71 ; R50.2 12.3,3.15 ; R50.2 v2(12.45,3.43) ; 82.04,3.58 SW2.5 82.04,1.9 ; v2(18.3,28.63) 18.38,28.7 R118.2 ; 85.47,25.91 86.56,25.91 ; 85.47,25.91 84.38,25.91 ; 85.47,25.91 85.47,24.82 ; 71.76,38.25 J5.8 71.76,40.49 ; 79.55,1.59 SW2.1 80.52,2.98 ; JP19.1 33.4,18.3 ; JP19.1 32.37,17.27 ; JP19.1 34.43,17.27 ; J3.14 52.07,4.27 ; J3.14 50.98,3.17 ; J3.14 52.07,2.08 ; J3.14 53.16,3.17 ; 4.83,10.53 J18.3 3.64,11.3 ; C32.2 v2(20.19,24.89) ; 67.03,34.64 C51.2 65.96,34.16 ; 67.89,45.03 C63.2 67.06,45.03 ; C35.2 v2(24,21.72) ; C35.2 23.73,20.34 ; C35.2 24,20.37 ; 27.34,37.56 C26.2 27.23,37.08 ; R120.2 v2(35.05,22.48) ; 10,24.86 R121.2 9.52,23.8 ; 26.62,12.8 C59.2 26.62,12.09 ; 14.12,9.07 C48.2 14.83,9.07 ; C60.2 v2(15.49,16.26) ; U6.7 v2(9.14,36.07) ; U6.7 8.98,36.42 ; U6.7 9.14,38.25 ; 77.31,16.54 C56.2 76.84,16.43 ; 11.69,49.94 SW1.4 12.33,49.1 ; R35.2 v2(27.81,20.95) ; 75.7,25.24 U8.4 75.55,25.24 ; R31.2 v2(22.22,34.42) ; v2(18.67,31.12) 18.67,31.12 C38.2
  TOP w0.508: R117.2 v2(29.84,33.27) ; L9.2 v2(10.67,43.56) ; SW3.6 v2(78.74,47.75) ; v2(9.14,30.61) 9.65,30.1 C14.2 ; SW1.5 v2(7.67,52.25) ; SW1.6 v2(8.63,47.75) ; R49.2 v2(12.45,7.24) ; C33.2 v2(20.45,21.21) ; C1.2 C53.2 58.42,36 v2(58.67,36.25) Y1.2 ; C15.2 C24.2 v2(35.43,17.02) ; v2(21.34,12.45) C57.2 C58.2 C59.2 v2(26.92,12.45) ; C52.2 v2(80.52,10.29) ; v2(53.47,33.02) C61.2 55.63,33.02 55.75,33.15 C5.2 ; SW2.5 v2(83.11,2.74) ; C34.2 C36.2 v2(22.35,17.91) ; C48.2 v2(14.48,8.89) ; 25.64,3.05 v2(24.64,3.05) ; v2(74.8,25.27) 74.95,25.42 75.67,25.42 75.86,25.23 U8.4 ; C63.2 v2(68.2,44.32) ; SW3.3 v2(83.01,52.25) ; R26.2 20.07,27.18 v2(20.32,26.92) ; SW3.5 v2(77.67,52.25) ; SW1.3 v2(12.65,52.25) ; C49.2 v2(66.68,35.18) ; R123.2 v2(10.41,39.24) ; C64.2 v2(8.13,29.46) ; C62.2 v2(68.2,12.06) ; SW2.6 v2(82.04,7.24) ; SW3.1 v2(80.26,53.85) ; C41.2 v2(10.54,42.16) ; R121.2 v2(10.29,24.38) ; SW2.4 v2(78.99,7.11) ; C31.2 v2(21.97,21.21) ; SW2.1 v2(80.52,1.02) ; C26.2 v2(27.81,37.85) ; SW1.1 v2(10.16,53.85) ; C51.2 v2(67.31,34.16) ; 51.05,25.91 v2(50.16,25.91) ; SW1.4 v2(11.69,47.75) ; SW2.3 v2(78.03,2.74) ; SW3.4 v2(81.79,47.75) ; L3.2 v2(9.72,18.86) ; R122.2 v2(10.54,20.07)
  BOTTOM w0.381: 88.01,25.91 88.01,27 ; 88.01,25.91 89.1,25.91 ; 88.01,25.91 88.01,24.82 ; 88.01,25.91 86.92,25.91 ; 6.1,33.71 6.1,34.31 ; 6.1,34.31 5.5,34.31 ; 6.1,34.31 6.69,34.31 ; 19.3,49.06 J9.1 ; J9.1 19.3,51.27 ; J9.1 20.41,50.16 ; J9.1 18.2,50.16 ; J12.1 22.19,2.41 ; J12.1 19.98,2.41 ; J12.1 21.08,1.31 ; J12.1 21.08,3.52 ; 88.01,9.94 J10.1 ; J10.1 88.01,12.15 ; J10.1 89.12,11.05 ; J10.1 86.91,11.05 ; 6.1,19.2 6.69,19.2 ; 6.1,19.2 5.5,19.2 ; 6.1,19.2 6.1,18.6 ; J3.14 52.07,4.27 ; J3.14 52.07,2.08 ; J3.14 50.98,3.17 ; J3.14 53.16,3.17 ; 82.33,43.18 J11.1 ; J11.1 83.44,44.29 ; J11.1 84.54,43.18 ; J11.1 83.44,42.07 ; 84.38,25.91 85.47,25.91 ; 85.47,25.91 85.47,24.82 ; 85.47,25.91 86.56,25.91 ; 85.47,25.91 85.47,27 ; 36.82,37.72 J25.2 ; J25.2 37.85,38.75 ; J25.2 37.85,36.69 ; 33.4,16.24 JP19.1 ; JP19.1 32.37,17.27 ; JP19.1 34.43,17.27 ; JP19.1 33.4,18.3 ; J2.14 35.31,52.46 ; J2.14 34.28,51.44 ; J2.14 35.31,50.41 ; J2.14 36.34,51.44 ; JP20.1 17.78,40.65 ; JP20.1 18.81,39.62 ; JP20.1 17.78,38.59 ; JP20.1 16.75,39.62 ; 4.15,34.31 J15.B1 5.34,34.31 ; 49.53,3.17 49.53,4.27 ; 49.53,3.17 49.53,2.08 ; 49.53,3.17 50.62,3.17 ; 49.53,3.17 48.44,3.17 ; 16.76,13.32 J22.2 ; J22.2 17.79,14.35 ; J22.2 15.73,14.35 ; 70.64,16.51 71.76,16.51 ; 71.76,16.51 71.76,17.63 ; 71.76,16.51 72.87,16.51 ; 71.76,16.51 71.76,15.39 ; 4.15,19.2 J8.B1 5.34,19.2 ; 70.64,39.37 J5.8 ; J5.8 71.76,38.25 ; J5.8 72.87,39.37 ; J5.8 71.76,40.49 ; 23.49,42.02 JP8.1 ; JP8.1 23.49,44.08 ; JP8.1 24.52,43.05 ; JP8.1 22.47,43.05 ; 3.64,11.3 J18.3 4.83,10.53
  BOTTOM w0.508: 6.98,25.15 J8.A1 J8.B12 3.68,25.15 ; 3.68,40.26 J15.B12 J15.A1 6.98,40.26
  vias: v2(0.89,16) v2(0.89,12.95) v2(1.14,45.85) v2(1.14,43.94) v2(1.14,31.24) v2(1.14,10.29) v2(1.14,8.13) v2(1.27,28.7) v2(1.27,5.59) v2(4.45,0.89) v2(5.46,53.47) v2(6.6,45.21) v2(7.37,0.89) v2(8.51,32.64) v2(8.89,13.72) v2(10.16,44.7) v2(10.16,15.75) v2(10.29,11.81) v2(12.45,43.05) v2(13.21,45.72) v2(14.1,44.32) v2(14.22,47.37) v2(14.73,53.59) v2(14.86,41.27) v2(15.37,23.49) v2(15.37,19.43) v2(15.49,33.78) v2(16.26,18.29) v2(17.14,43.69) v2(17.14,26.03) v2(17.53,34.42) v2(17.65,53.59) v2(17.65,12.45) v2(18.29,5.97) v2(18.54,16.38) v2(18.92,35.43) v2(18.92,1.14) v2(19.68,19.18) v2(19.94,12.32) v2(20.45,47.37) v2(20.83,45.97) v2(20.83,18.29) v2(20.95,34.93) v2(20.95,33.15) v2(21.08,53.59) v2(21.08,44.2) v2(21.72,38.99) v2(23.75,47.37) v2(23.88,53.59) v2(24.89,37.85) v2(25.78,45.85) v2(25.78,43.69) v2(25.78,41.27) v2(27.3,35.31) v2(27.81,46.1) v2(27.81,18.8) v2(29.21,53.47) v2(29.84,36.07) v2(30.23,34.29) v2(30.48,46.23) v2(31.5,31.12) v2(31.62,17.65) v2(31.75,19.18) v2(31.88,40.13) v2(32,43.31) v2(32,37.97) v2(32.51,53.59) v2(33.15,31.75) v2(34.04,35.81) v2(34.04,33.91) v2(34.16,45.59) v2(35.18,31.75) v2(35.56,38.1) v2(35.94,46.36) v2(36.07,42.04) v2(36.83,53.47) v2(37.46,33.02) v2(37.72,46.36) v2(39.37,43.69) v2(39.62,46.36) v2(40.89,42.16) v2(41.53,36.45) v2(41.66,39.75) v2(41.66,34.42) v2(41.78,46.23) v2(41.78,31.75) v2(41.78,28.83) v2(41.78,26.42) v2(41.78,23.37) v2(42.42,53.59) v2(42.42,43.82) v2(42.8,41.27) v2(43.69,8.38) v2(43.81,10.03) v2(44.32,16.64) v2(45.34,40.89) v2(45.34,15.49) v2(46.86,53.59) v2(48.13,47.5) v2(48.26,45.59) v2(48.64,36.83) v2(48.64,34.67) v2(48.77,1.27) v2(48.89,26.54) v2(48.89,23.62) v2(48.89,9.91) v2(49.28,16.76) v2(49.28,15.49) v2(49.4,28.58) v2(49.4,11.56) v2(50.29,27.69) v2(50.8,45.47) v2(51.31,1.27) v2(51.44,15.37) v2(51.56,53.47) v2(51.94,43.82) v2(52.58,11.43) v2(52.58,9.91) v2(53.21,31.37) v2(53.59,1.14) v2(53.72,45.47) v2(55.24,43.69) v2(55.75,1.14) v2(56.13,53.59) v2(58.04,1.14) v2(58.17,3.94) v2(58.29,5.59) v2(58.55,43.56) v2(58.67,41.15) v2(59.18,7.49) v2(60.07,10.92) v2(60.45,1.02) v2(60.58,43.82) v2(61.21,53.47) v2(61.98,36.83) v2(62.1,41.27) v2(62.87,46.74) v2(62.99,29.59) v2(63.75,43.82) v2(64.26,14.61) v2(64.39,41.91) v2(65.53,33.85) v2(65.79,53.47) v2(66.04,14.73) v2(66.8,37.21) v2(67.18,30.86) v2(67.56,22.35) v2(67.69,9.52) v2(67.95,46.61) v2(67.95,41.15) v2(68.07,14.48) v2(68.33,31.62) v2(68.45,24.51) v2(68.83,42.93) v2(68.83,34.42) v2(69.34,37.21) v2(69.72,45.47) v2(69.72,33.02) v2(70.36,29.46) v2(70.36,10.29) v2(70.87,53.72) v2(71.63,34.42) v2(71.63,7.87) v2(71.88,37.21) v2(72.01,41.4) v2(72.26,43.94) v2(72.26,31.62) v2(72.26,25.15) v2(73.91,10.67) v2(74.04,33.27) v2(74.04,14.1) v2(74.42,47.24) v2(74.42,7.75) v2(74.55,1.02) v2(74.68,5.08) v2(74.8,40.77) v2(74.8,37.08) v2(74.93,53.72) v2(75.06,30.99) v2(76.71,7.11) v2(76.84,16.26) v2(77.09,14.1) v2(77.22,1.02) v2(77.34,53.72) v2(77.85,45.72) v2(77.85,16.26) v2(78.87,24.64) v2(78.87,22.1) v2(78.87,19.94) v2(79.12,17.65) v2(79.25,14.22) v2(79.5,31.88) v2(79.63,41.27) v2(80.14,27.05) v2(81.28,42.67) v2(81.28,28.07) v2(81.53,12.95) v2(81.79,32.77) v2(83.19,39.5) v2(83.19,1.02) v2(83.31,24.13) v2(83.69,34.8) v2(84.07,53.72) v2(84.84,45.47) v2(84.84,41.27) v2(85.98,1.02) v2(86.23,53.72) v2(86.36,20.95) v2(86.36,13.46) v2(86.74,39.5) v2(88.65,21.08) v2(88.77,40.51) v2(90.42,35.31) v2(90.42,31.62) v2(90.42,23.11) v2(90.42,9.27) v2(90.55,49.91) v2(90.55,44.7) v2(90.55,42.42) v2(90.55,39.75) v2(90.55,27.43) v2(90.55,11.43) v2(90.68,19.3) v2(90.68,15.24)
P5V_HDR_IN: length 4.1
  TOP w0.381: J22.3 14.22,15.38 ; J22.3 14.22,13.32 ; J22.3 13.19,14.35 ; J22.3 15.25,14.35
P5V_MCU_LINK_USB: length 22
  TOP w0.381: L8.2 10.54,40.77 ; L8.2 9.97,40.09 ; L8.2 9.97,41.44 ; D2.A 12.87,38.84 ; D2.A 11.52,38.84 ; D2.A 12.19,39.52
  TOP w0.508: D2.A 12.21,38.86 13.72,38.86 14.61,37.97 14.61,27.18 15.24,26.54 16.13,26.54 16.76,27.18 R24.1
P5V_USB_FS: length 1.3
  TOP w0.508: D1.A R9.1
VBAT_DCDC/VBAT_PMU: length 8.1
  TOP w0.254: U4.N13 24.43,22.94 v1(24.77,22.61) 24.93,22.77 U4.M13
  TOP w0.508: v1(24.77,22.61) 24.77,21.97 25.02,21.72 C35.1 25.02,20.19 24.89,20.07 C34.1 ; C34.1 C36.1 ; C34.1 26.5,19.43 L7.2
VDD_BOARD: length 228
  TOP w0.381: R55.1 79.12,43.56 82.3,40.39 87.38,40.39 89.41,38.35 89.41,24.77 88.01,23.37
  TOP w0.508: L7.1 27.52,17.7 28.32,16.89 v2(28.32,16.38) ; R51.1 14.22,42.67 R53.1 20.32,42.67 20.83,42.16 R32.1 20.07,41.4 19.68,41.02 19.68,38.86 21.34,37.21 v2(23.75,37.21) R30.1 ; R15.1 R17.1 R19.1 v2(35.81,33.02) ; v2(72.14,10.67) 73.41,9.4 R52.1 ; R47.1 R46.1 v2(12.57,5.46) ; v2(12.95,8.76) C48.1 R44.1 R45.1 ; v2(25.27,34.42) 25.4,34.29 L5.1
  TOP w0.762: v2(72.14,10.67) R64.1 72.14,14.22 74.42,16.51 R56.1 75.57,15.88 76.11,15.33 78.83,15.33 79.76,16.26 R58.1 81.03,15.37 81.56,14.83 88.62,14.83 89.79,16 89.79,21.59 88.01,23.37 85.47,23.37 ; R68.2 36.58,10.29 36.45,10.41 JP6.1 ; v2(39.37,14.48) 49.15,14.48 49.53,14.1 53.85,14.1 55.24,12.7 55.24,11.3 v2(55.37,11.18)
  BOTTOM w0.381: 35.83,10.41 JP6.1 34.8,9.38 ; 38.28,3.17 J3.4 ; J3.4 39.37,4.27 ; J3.4 40.46,3.17
  BOTTOM w0.508: v2(28.32,16.38) 28.32,16.13 28.96,15.49 35.81,15.49 ; JP6.1 34.54,10.67 34.54,12.7 34.29,12.95 30.23,12.95 28.7,11.43 15.62,11.43 v2(12.95,8.76) 12.19,8.76 11.68,8.25 11.68,6.35 v2(12.57,5.46) ; v2(25.27,34.42) 23.75,35.94 v2(23.75,37.21) 23.75,38.1 24.64,38.99 32.38,38.99 35.81,35.56 v2(35.81,33.02) 36.96,31.88 36.96,22.1 39.37,19.69 v2(39.37,19.18)
  BOTTOM w0.762: v2(55.37,11.18) 57.98,8.57 70.29,8.57 72.14,10.41 v2(72.14,10.67)
  vias: v2(39.37,18.29)
VDD_MCU: length 36.1
  TOP w0.254: 59.44,29.72 59.18,29.97 58.46,29.97 58.07,30.35 58.07,31.15 U9.13
  TOP w0.305: C5.1 57.53,33.15 58.07,32.6 58.07,31.15 U9.13 ; v2(53.34,22.99) 53.5,23.15 U9.29 ; 64.62,27.15 66.08,27.15 U9.60 67.69,27.15 67.72,27.18 C4.1 ; v2(66.93,19.18) 66.42,18.67 64.38,18.67 64.08,18.97 64.08,19.65 U9.48
  TOP w0.381: v2(53.34,22.99) 53.21,22.86 C3.1 ; C2.1 v2(66.93,19.18)
  TOP w0.508: v2(63.12,24.89) 63.12,25.65 64.62,27.15 ; v2(59.94,25.65) 60.2,25.91 60.2,28.96 59.44,29.72
  BOTTOM w0.381: v2(53.34,22.99) 54.36,22.99 54.74,23.37 54.74,25.27
  BOTTOM w0.508: v2(66.93,19.18) 65.66,20.45 65.66,23.88 64.64,24.89 v2(63.12,24.89) 61.85,24.89
VDD_P3T: length 11.9
  TOP w0.381: R62.1 v2(75.06,22.23) 76.84,22.23 77.81,21.25 U8.8 ; R61.1 v2(75.06,23.88)
  TOP w0.508: R56.2 C56.1 C55.1 77.81,18.07 U8.8
  BOTTOM w0.381: v2(75.06,23.88) v2(75.06,22.23)
VDD_USB: length 9.7
  TOP w0.305: 53.59,25.15 U9.25
  TOP w0.508: 53.59,25.15 53.34,25.15 52.58,25.91 C7.1 52.07,26.29 51.56,26.8 50.04,26.8 49.02,27.81 v2(47.37,27.81) R67.2
VDDA_MCU: length 38.2
  TOP w0.305: U9.12 58.57,31.15 58.57,32.87 C1.1
  TOP w0.508: J2.16 34.04,50.16 34.04,47.12 35.81,45.34 42.42,45.34 46.99,40.77 47.88,40.77 48.64,40.01 L1.1 v2(48.64,37.97) ; C1.1 56.64,34.04 56.13,34.54 C61.1 v2(52.96,34.54)
  BOTTOM w0.508: v2(48.64,37.97) 49.53,37.97 v2(52.96,34.54)
DBGIF_DETECT: length 58.6
  TOP w0.152: U4.E9 28.43,24.91 v1(28.57,24.77) ; v2(38.23,21.84) 35.69,21.84 35.05,21.21 29.46,21.21 28.19,22.48 v1(28.19,22.61) ; v2(40.26,8.89) 38.86,7.49 35.82,7.49 32.77,4.45 20.07,4.45 17.78,2.16 12.19,2.16
  BOTTOM w0.152: v1(28.57,24.77) 28.57,22.99 v1(28.19,22.61) ; v2(40.26,8.89) 40.26,19.94 38.35,21.84 v2(38.23,21.84)
DBGIF_ISP0_CTRL: length 8.9
  TOP w0.152: U4.C13 29.43,22.77 29.84,22.35 30.99,22.35 31.75,23.11 35.56,23.11 R72.2
DBGIF_RESET: length 10.6
  TOP w0.152: R70.2 35.56,29.21 31.9,29.21 31.75,29.06 31.75,28.45 30.93,27.63 29.64,27.63 29.56,27.72 28.99,27.72 28.78,27.51 28.78,27.13 U4.E6
DBGIF_TCK_SWCLK: length 7.1
  TOP w0.152: U4.L12 25.78,23.44 25.78,22.48 26.42,21.84 27.69,21.84 28.57,20.95 28.57,19.96 28.73,19.81 JP10.1
DBGIF_TDI: length 11.8
  TOP w0.152: U4.F5 28.71,28.07 29.67,28.07 29.79,27.94 30.73,27.94 31.37,28.58 31.37,29.21 31.75,29.59 35.31,29.59 35.94,30.23 35.94,31.12 R73.2
DBGIF_TDO_SWO: length 11.3
  TOP w0.152: v2(31.44,26.74) 32.64,27.94 35.81,27.94 R71.2 ; U4.F8 v1(27.93,26.29)
  BOTTOM w0.152: v1(27.93,26.29) 28.44,25.78 31.11,25.78 31.44,26.11 v2(31.44,26.74)
DBGIF_TMS_SWDIO: length 8.9
  TOP w0.152: U4.B11 30.28,24.64 35.18,24.64 35.69,25.15 35.69,26.29 R69.2
DBGIF_VREF: length 6.2
  TOP w0.254: U4.L1 25.43,30.19 25.27,30.35
  TOP w0.381: 25.27,30.35 24.52,31.11 v2(24.39,31.11) 24,31.49 C42.1
  TOP w0.508: C42.1 24,32.26 23.75,32.51 R31.1 R30.2
FL_USB1_DM: length 31.8
  TOP w0.22: v2(10.79,36.7) 10.58,36.92 10.25,36.92 10.17,36.84 U6.1 ; U4.N6 23.5,26.79 22.56,27.73 15.87,27.73 v2(15.62,27.48)
  BOTTOM w0.22: v2(15.62,27.48) 15.37,27.74 11.89,27.74 10.08,29.54 10.08,34.85 11.35,36.12 11.35,36.7 11.13,36.92 11.01,36.92 v2(10.79,36.7) 10.58,36.92 7.57,36.92 7.37,37.12 6.36,37.12 J15.A7 5.25,37.71 J15.B7
FL_USB1_DP: length 33.5
  TOP w0.22: U6.2 10.16,37.34 10.25,37.25 10.58,37.25 v2(10.79,37.47) ; J15.A6 5.25,36.86 J15.B6 ; v2(22.73,28.19) 22.6,28.06 15.88,28.06 v2(15.62,28.32) ; U4.M6 25.14,26.79 v1(25.4,27.05)
  BOTTOM w0.22: v2(15.62,28.32) 15.37,28.07 12.02,28.07 10.41,29.68 10.41,34.71 11.68,35.98 11.68,36.84 11.27,37.25 11.01,37.25 v2(10.79,37.47) 10.58,37.25 7.71,37.25 7.51,37.45 6.36,37.45 J15.A6 ; v2(22.73,28.19) 23.11,27.81 24,27.81 24.77,27.05 v1(25.4,27.05)
HW_VER_0: length 5.6
  TOP w0.152: R36.1 32.64,25.27 32.31,24.94 30.1,24.94 29.92,24.77 29.21,24.77 28.96,25.02 28.96,25.27 U4.E8
HW_VER_1: length 3.5
  TOP w0.152: R37.1 32.89,27.3 31.38,25.79 U4.A8
HW_VER_2: length 7.8
  TOP w0.152: R120.1 32.77,21.97 29.72,21.97 29.08,22.61 29.08,23.62 27.93,24.78 U4.F9
HW_VER_3: length 4.3
  TOP w0.152: R117.1 29.84,30.73 29.08,29.97 29.08,28.6 29.24,28.45 29.59,28.45 U4.B2
HW_VER_4: length 5.8
  TOP w0.152: R118.1 20.45,29.08 22.61,29.08 24.03,27.66 24.56,27.66 U4.M5
HW_VER_5: length 5.3
  TOP w0.152: R119.1 25.27,31.62 26.09,30.81 26.09,28.13 U4.H5
HW_VER_6: length 11.5
  TOP w0.152: U4.H9 26.09,24.44 26.09,22.68 26.54,22.23 27.81,22.23 29.21,20.83 31.11,20.83 32.13,19.81 JP19.2
HW_VER_7: length 12.2
  TOP w0.152: JP20.2 17.78,35.31 20.57,32.51 20.57,30.73 20.95,30.35 22.87,30.35 U4.N2
HW_VER_8: length 2.6
  TOP w0.152: U4.L13 25.43,22.32 26.04,21.72 R35.1
JTAG_VREF: length 8.7
  TOP w0.508: R44.2 10.03,9.91 9.4,10.54 9.4,11.56 7.24,13.72 5.53,13.72 4.83,13.02 J18.1
LDO_3V3: length 31.4
  TOP w0.381: 31.23,10.41 JP6.2 ; JP6.2 32.26,9.38 ; JP6.2 33.29,10.41 ; JP6.2 32.26,11.44 ; C11.1 30.18,9.52 ; C11.1 28.5,9.52 ; C11.1 29.34,10.24 ; 26.6,10.14 U2.5 25.57,10.68 ; 28.83,10.78 TP2.1 ; TP2.1 29.6,11.56 ; TP2.1 28.05,11.56 ; 46.94,26.29 R2.1 46.23,25.45 ; 27.23,9.4 C10.1 ; C10.1 27.81,9.98 ; C10.1 28.4,9.4 ; JP3.1 46.74,24.4 ; JP3.1 46.74,22.34 ; JP3.1 47.77,23.37
  TOP w0.508: J14.1 30.35,2.79 30.1,3.05 R12.1
  BOTTOM w0.381: JP6.2 32.26,11.44 ; JP6.2 31.23,10.41 ; JP6.2 32.26,9.38 ; JP6.2 33.29,10.41 ; J14.1 32,3.9 ; J14.1 33.11,2.79 ; J14.1 32,1.69 ; J14.1 30.9,2.79 ; 43.36,3.17 J3.8 ; J3.8 45.54,3.17 ; J3.8 44.45,2.08
LED_USB_COMM: length 14.9
  TOP w0.152: U4.F12 27.93,24.28 v1(27.43,24.79) ; D5.C v2(31.48,35.81)
  BOTTOM w0.152: v1(27.43,24.79) 27.43,27.05 28.57,28.19 28.57,30.73 30.99,33.15 30.99,35.32 v2(31.48,35.81)
LED_VCOM_ACT: length 8.5
  TOP w0.152: D8.C v2(31.48,32.13) ; U4.B6 29.2,26.79 v1(29.08,26.67)
  BOTTOM w0.152: v2(31.48,32.13) 29.34,29.98 29.34,28.07 28.83,27.56 28.83,26.92 v1(29.08,26.67)
MCU_LINK_3V3: length 49.5
  TOP w0.254: U4.N7 23.11,26.29 v2(22.99,26.42) ; U4.A9 31.89,25.29 v2(32.51,25.91) ; v2(32.51,28.58) 31.23,27.29 U4.A5 ; U4.A3 30.58,28.29 30.86,28.57 30.86,29.46 31.62,30.23 v2(32.51,30.23) ; U4.A13 30.91,23.29 ; U4.M1 24.93,29.8 24.64,30.1
  TOP w0.381: 30.91,23.29 31.37,23.75 v2(32.51,23.75) C19.1 ; v2(32.51,28.58) C20.1 ; 24.64,30.1 24.26,30.48 23.49,30.48 v2(23.24,30.73) 22.99,30.99 C17.1 ; C40.1 32.89,26.29 v2(32.51,25.91) ; C39.1 v2(22.99,26.42) ; v2(29.97,37.08) R13.1 ; v2(32.51,30.23) C18.1
  BOTTOM w0.381: v2(29.97,37.08) 31.24,37.08 32.26,36.07 32.26,31.5 32.53,31.22 32.53,30.24 v2(32.51,30.23) ; v2(32.51,23.75) 32.51,22.61 31.5,21.59 27.05,21.59 22.99,25.65 v2(22.99,26.42) C39.1 21.59,26.8 21.59,29.08 v2(23.24,30.73)
  vias: v2(35.18,20.32) v2(35.18,19.56)
MCU_LINK_N_16MHZ: length 9.2
  TOP w0.152: U4.M3 24.59,27.95 24.25,27.95 22.6,29.6 C37.1 18.28,29.6 18.15,29.73 Y2.2
MCU_LINK_P_16MHZ: length 10.1
  TOP w0.152: U4.N3 22.75,29.97 20.7,29.97 20.19,30.48 20.19,31.75 20.07,31.87 C38.1 18.28,31.87 18.15,31.73 Y2.1
MCU_LINK_RST: length 10.5
  TOP w0.152: R14.2 25.78,35.69 24.64,34.54 24.64,31.62 25.78,30.48 25.78,27.44 U4.J6
MCU_LNK_RX: length 10.4
  TOP w0.152: U4.E12 28.78,23.45 28.78,22.41 29.59,21.59 34.92,21.59 36.2,22.86 R75.1
MCU_LNK_TX: length 7.1
  TOP w0.152: R74.1 36.07,25.15 36.07,25.02 35.34,24.29 U4.A11
MCU_VDD_P3V3: length 16.6
  TOP w0.381: 43.04,32.26 JP2.1 ; JP2.1 44.07,31.23 ; JP2.1 44.07,33.29 ; R66.1 44.32,39.83 ; R66.1 43.61,38.99 ; R66.1 44.32,38.15 ; 44.7,30.18 R1.1 43.99,29.34 ; 43.99,26.97 R67.1 43.99,27.81 ; 43.17,23.37 JP3.2 ; JP3.2 44.2,22.34 ; JP3.2 44.2,24.4 ; 44.7,25.45 R2.2 43.99,26.29 ; 43.04,36.07 JP1.1 ; JP1.1 44.07,35.04 ; JP1.1 44.07,37.1
Net_7: length 0.5
  TOP w0.152: 26.93,26.79 v1(26.93,26.29)
P0_0/SWDIO: length 94.9
  TOP w0.152: U9.49 66.08,21.65 64.85,21.65 v2(64.79,21.59) ; R69.1 v2(39.24,27.43) 40.64,26.03 40.64,22.73 42.29,21.08 v2(50.29,21.08) ; v2(41.27,10.92) 39.62,10.92 37.72,9.02 35.05,9.02 32,5.97 19.31,5.97 18.69,5.35 D13.6 17.34,5.78 16.51,6.6 14.61,6.6 12.95,8.25 10.82,8.25 10.67,8.41 R45.2 9.14,8.89 8.76,9.27 8.76,11.18 7.37,12.57 J18.2
  BOTTOM w0.152: v2(64.79,21.59) 64.79,22.08 63.38,23.49 58.29,23.49 56,21.21 50.42,21.21 v2(50.29,21.08) ; v2(39.24,27.43) 37.97,26.16 37.97,23.37 41.27,20.07 v2(41.27,10.92)
P0_1/SWCLK: length 81.2
  TOP w0.152: v2(50.67,19.56) 50.04,18.92 41.27,18.92 38.23,15.88 32.26,15.88 30.86,17.27 JP10.2 ; J18.4 7.62,11.3 v2(8.13,10.79) 8.38,10.54 8.38,9.02 10.16,7.24 R49.1 10.67,7.62 10.92,7.87 12.7,7.87 14.35,6.22 16.26,6.22 16.64,5.84 16.64,4.85 16.79,4.7 D13.5 ; v2(64.14,21.97) 64.31,22.15 66.08,22.15 U9.50
  BOTTOM w0.152: v2(50.67,19.56) 50.8,19.43 54.86,19.43 58.55,23.11 63.25,23.11 64.14,22.23 v2(64.14,21.97) ; v2(8.13,10.79) 12.95,15.62 22.35,15.62 24,17.27 JP10.2
P0_2: length 104.7
  TOP w0.152: v2(49.66,20.57) 49.53,20.7 42.04,20.7 40.26,22.48 40.26,25.4 v2(39.37,26.29) 38.99,25.91 R74.2 ; U9.51 66.08,22.65 64.98,22.65 v2(64.77,22.86) ; v2(42.04,10.92) 41.53,10.41 39.75,10.41 37.97,8.64 35.31,8.64 32.26,5.59 19.56,5.59 18.02,4.05 D13.4 16.78,4.05 16.26,4.57 16.26,5.59 16,5.84 13.46,5.84 12.83,6.48 10.29,6.48 6.73,10.03 J18.6 ; R71.1 v2(39.24,28.96)
  BOTTOM w0.152: v2(49.66,20.57) 49.66,21.44 49.81,21.59 55.88,21.59 58.17,23.88 63.75,23.88 v2(64.77,22.86) ; J25.3 38.48,34.54 38.48,32 39.75,30.73 39.75,30.1 39.24,29.59 v2(39.24,28.96) 39.75,28.45 39.75,26.67 v2(39.37,26.29) 38.35,25.27 38.35,23.5 42.04,19.81 v2(42.04,10.92)
P0_3: length 112.4
  TOP w0.152: J18.8 6.98,8.76 10.29,5.46 R46.2 10.67,5.84 10.92,6.1 12.7,6.1 13.21,5.59 13.21,4.95 14.11,4.05 D13.3 15.17,3.62 15.75,3.05 18.16,3.05 19.94,4.83 32.64,4.83 35.69,7.87 38.48,7.87 40,9.4 41.53,9.4 v2(42.04,9.91) ; U9.52 66.08,23.15 65.24,23.15 v2(64.77,23.62) ; R73.1 v2(39.24,32) ; R75.2 38.73,23.24 v2(39.37,23.24) 39.37,22.1 41.91,19.56 v2(49.91,19.56)
  BOTTOM w0.152: v2(49.91,19.56) 49.78,19.56 49.15,20.19 49.15,21.46 49.66,21.97 55.75,21.97 58.04,24.26 64.14,24.26 v2(64.77,23.62) ; J25.1 38.86,40.26 39.24,39.88 v2(39.24,32) 40.13,31.12 40.13,26.29 38.86,25.02 38.86,23.75 v2(39.37,23.24) 42.67,19.94 42.67,10.54 v2(42.04,9.91)
P0_6/CLKOUT: length 25.5
  TOP w0.152: U9.53 67.16,23.65 68.33,22.48 68.33,19.3 69.09,18.54 73.03,18.54 v2(73.53,18.03)
  BOTTOM w0.152: v2(73.53,18.03) 73.53,16 78.49,11.05 J19.1
P0_16/I3C0_SDA-P3T: length 17.7
  TOP w0.152: U9.54 66.08,24.15 67.16,24.15 68.71,22.6 68.71,20.57 69.09,20.19 J20.1 72.26,20.19 R59.2 R62.2 73.28,22.61 73.53,22.86 77.47,22.86 77.81,23.2 U8.1
P0_17/I3C0_SCL-P3T: length 12.9
  TOP w0.152: U9.55 67.17,24.65 67.95,23.88 J21.1 R61.2 73.28,23.37 73.41,23.24 77.01,23.24 77.16,23.39 U8.2
P1_0: length 42.6
  TOP w0.152: 85.47,33.53 86.61,32.38 86.61,27.56 86.23,27.18 84.46,27.18 82.8,28.83 72.39,28.83 68.71,25.15 U9.56 65.18,25.15 65.02,25 65.02,24.64 64.92,24.54 64.92,24.52 63.63,23.23 v2(63.63,20.95)
  BOTTOM w0.152: J6.6 65.41,17.78 63.37,17.78 62.87,18.29 62.87,20.19 v2(63.63,20.95)
P1_1: length 33.6
  TOP w0.152: v2(63.12,22.48) 63.12,23.23 64.64,24.75 64.64,25.15 65.15,25.65 66.08,25.65 U9.57 68.7,25.65 72.26,29.21 84.71,29.21 85.47,28.45
  BOTTOM w0.152: J6.4 61.59,17.53 61.21,17.91 61.21,21.46 61.85,22.1 62.74,22.1 v2(63.12,22.48)
P1_2: length 34.1
  TOP w0.152: v2(62.99,21.21) 62.99,21.85 62.61,22.23 62.61,23.23 64.26,24.88 64.26,25.27 65.14,26.15 66.08,26.15 U9.58 68.7,26.15 72.14,29.59 81.79,29.59 83.19,30.99 85.47,30.99
  BOTTOM w0.152: v2(62.99,21.21) 62.48,20.71 62.48,18.16 J6.5
P1_3: length 38.9
  TOP w0.152: v2(62.1,22.61) 62.1,23.11 63.88,24.89 63.88,25.52 65.01,26.65 66.08,26.65 U9.59 66.08,26.65 68.69,26.65 72.01,29.97 79.5,29.97 80.77,31.24 80.77,33.02 83.82,36.07 J7.1
  BOTTOM w0.152: J6.3 59.05,21.08 59.69,21.72 60.96,21.72 61.85,22.61 v2(62.1,22.61)
